# Altium PCB esp32s3.PcbDoc (part 2 of 3)
Units mm, origin at the board's own origin, x right, y up, seen from the top; angles counter-clockwise.
Board outline 131.57 x 101.6 mm, 2 copper layers (Top Layer, Bottom Layer); 173 components, 144 nets, 578 pads, 813 vias.
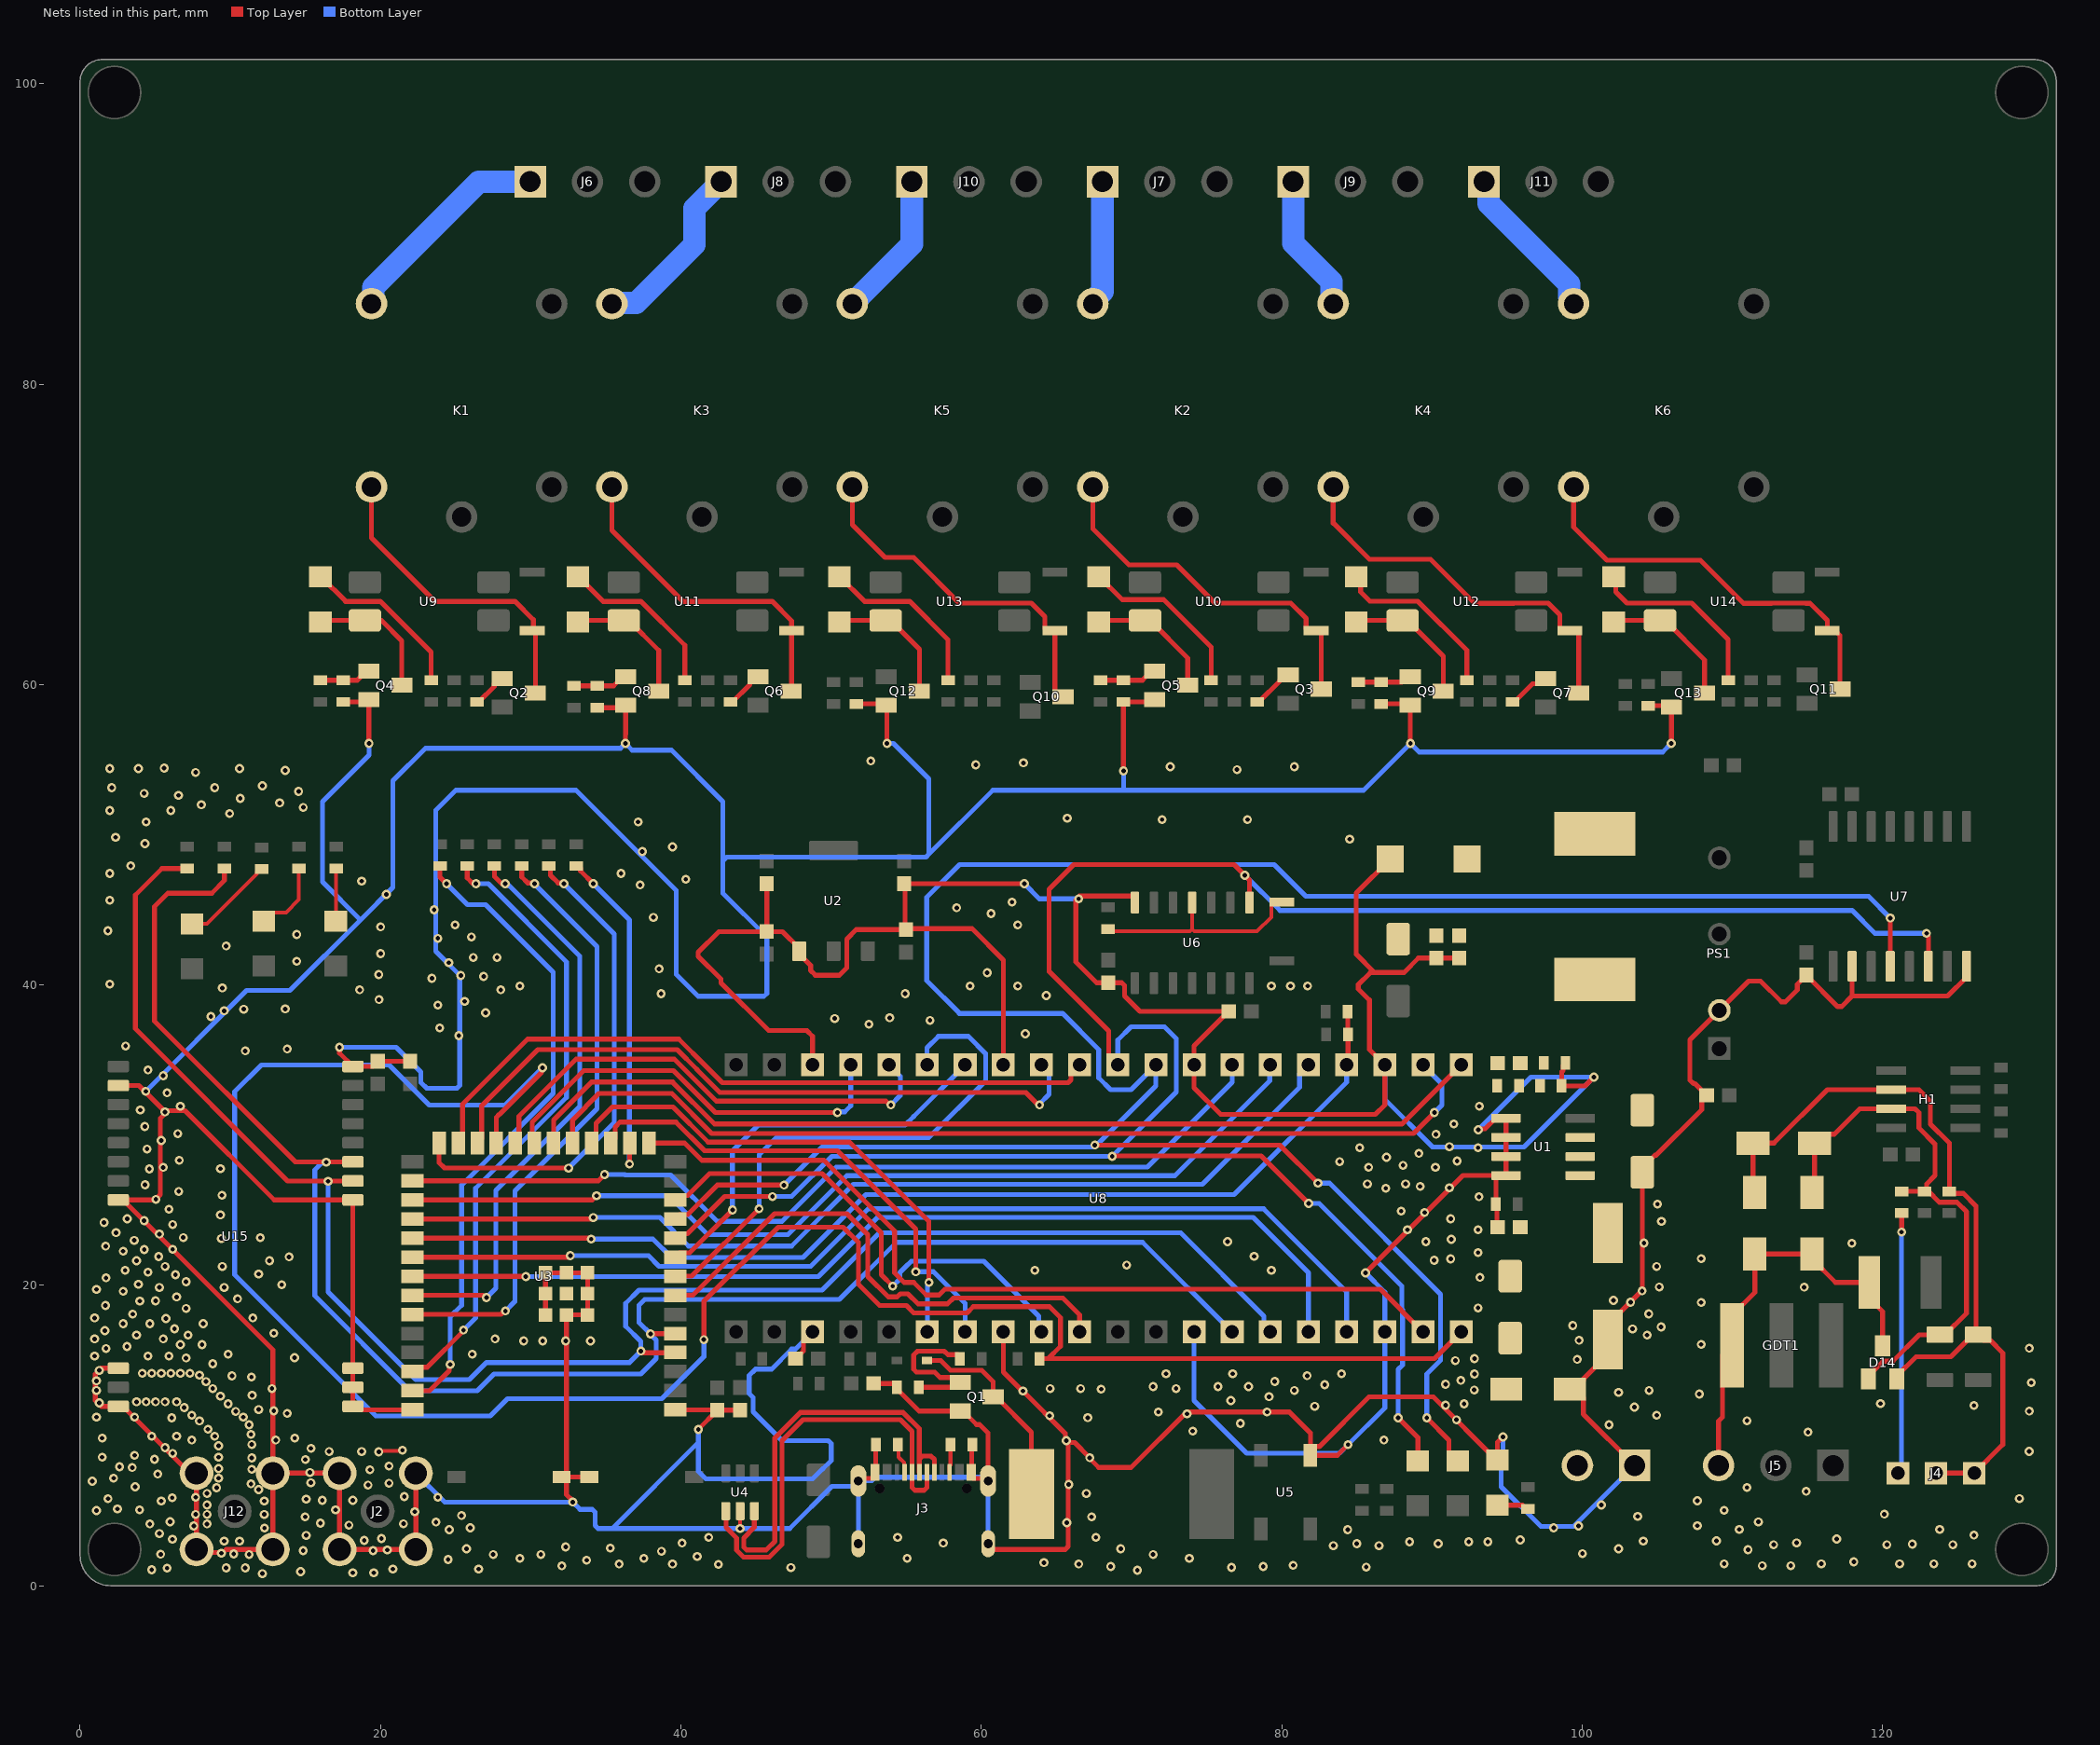
[diagram p2: the nets of this part, all layers, seen from the top]

## Via types
v1: diameter 0.6, hole 0.3, Top Layer to Bottom Layer, tented both sides, 813 vias

## Nets (pads, with @x,y where several pads share a name; then routed paths per layer and width w, separated by ;. In a path a pad name is that pad's centre, name@x,y a point inside that pad or via, vN(x,y) a via of type N, cw(c..) or ccw(c..) an arc to the next point about the centre after c; other vN are vias at no path point) (continued)
D_N: J3.A7 J3.B7 U4.1 | length 28.4
  Top Layer w0.324: U4.1@42.992,4.968 43.004,4.956 43.004,3.878 43.703,3.178 43.703,2.367 44.173,1.897 45.88,1.897 46.736,2.753 46.736,9.652 48.133,11.049 54.61,11.049 55.384,10.275 J3.B7@55.384,7.952 ; J3.B7@55.384,7.544 55.385,6.54 55.574,6.35 56.194,6.35 56.384,6.54 J3.A7@56.384,7.544
D_P: J3.A6 J3.B6 U4.3 | length 27.7
  Top Layer w0.324: U4.3@44.892,4.968 44.88,4.956 44.88,3.878 44.181,3.178 44.181,2.565 44.37,2.375 45.682,2.375 46.258,2.951 46.258,9.85 47.935,11.527 54.808,11.527 55.873,10.462 55.873,8.446 J3.A6@55.873,7.731 ; J3.A6@55.874,7.73 55.874,7.555 J3.A6@55.884,7.544 ; 55.884,8.446 56.074,8.636 56.642,8.636 56.872,8.406 56.872,7.556 J3.B6@56.884,7.544
Earth: C23.2 D11.2 D13.1 D14.3 GDT1.3 J5.3 | length 28.3
  Top Layer w0.324: J5.3@109.093,8.001 109.093,10.966 109.346,11.219 109.346,15.364 GDT1.3@109.984,16.002 109.984,18.002 111.506,19.524 D13.1@111.506,22.08 D11.2@115.316,22.08 115.316,21.755 116.878,20.193 C23.2@119.126,20.193 119.126,19.138 120.015,18.249 D14.3@120.015,15.959
  other v1: 111.999,1.33 113.904,1.33 109.459,1.457 115.936,1.457 121.143,1.457 123.429,1.457 125.969,1.457 118.095,1.584 111.053,2.392 112.761,2.727 120.297,2.727 124.689,2.727 121.991,2.769 114.285,2.854 108.951,2.981 116.952,3.108 126.096,3.362 110.475,3.743 123.81,3.743 107.681,3.997 111.745,4.251 120.127,4.759 109.459,5.013 107.681,5.648 129.123,5.801 114.92,6.283 110.983,6.537 129.771,8.938 115.047,10.22 110.983,10.982 129.779,11.617 126.096,11.998 119.873,12.125 107.808,12.76 129.906,13.522 129.779,15.808 107.935,16.062 107.935,18.856 114.793,19.872 107.935,21.777 117.968,22.793
GND: BOOT.1 C4.2 C5.1 C6.2 C7.1 C8.1 C9.1 C10.1 C11.1 C12.1 C13.1 C14.2 C15.2 C16.1 C17.1 C18.2 C19.2 C21.1 C24.2 C25.2 D3.1 D4.A J1.1 J2.G1 J2.G2 J2.G3 J2.G4 J3.A1_B12 J3.B1_A12 J3.SH1 J3.SH2 J3.SH3 J3.SH4 J12.G1 J12.G2 J12.G3 J12.G4 PS1.2 PWR.1 Q1.E Q4.E Q5.E Q8.E Q9.E Q12.E Q13.E R1.2 R2.2 R4.1 R9.1 R10.1 R20.1 R40.2 R41.2 R50.2 R51.2 R60.2 R61.2 RESET.1 U1.5 U1.6 U1.7 U1.8 U2.1 U3.1 U3.40 U3.41_1 U3.41_2 U3.41_3 U3.41_4 U3.41_5 U3.41_6 U3.41_7 U3.41_8 U3.41_9 U4.2 U5.3 U6.7 U7.2 U7.8 U8.3 U8.8 U8.13 U8.18 U8.23 U8.28 U8.33 U8.38 U15.2 U15.8 U15.11 U15.13 U15.14 U15.15 U15.16 U15.19 U15.26 | length 858.2
  Top Layer w0.254: v1(19.881,8.912) 19.934,8.965 21.411,8.965 v1(21.463,9.017) ; v1(43.942,3.81) U4.2@43.942,4.968
  Top Layer w0.324: U15.11@2.54,14.478 1.397,14.478 1.016,14.097 1.016,12.319 1.397,11.938 U15.13@2.54,11.938 2.86,11.938 7.305,7.493 J12.G1@7.747,7.493 7.747,5.886 7.747,4.743 7.747,3.981 J12.G3@7.747,2.413 7.948,2.212 9.345,2.212 v1(9.398,2.159) 9.473,2.159 9.727,2.413 J12.G4@12.827,2.413 J12.G2@12.827,7.493 ; U15.8@2.54,25.678 U15.8@2.86,25.678 ; U15.2@2.54,33.298 3.913,33.298 v1@5.581,31.63 ; v1(17.268,35.849) 17.268,35.46 U15.26@18.16,34.568 19.482,34.568 19.812,34.898 C25.2@19.812,34.913 C24.2@21.971,34.913 ; R40.2@17.526,58.838 19.064,58.838 Q4.E@19.22,58.994 v1@19.22,56.078 ; U3.40@22.135,11.711 18.707,11.711 18.48,11.938 U15.14@18.16,11.938 U15.15@18.16,13.208 U15.16@18.16,14.478 U15.19@18.16,25.678 12.93,25.678 6.978,31.63 v1@5.581,31.63 ; J2.G2@22.352,7.493 J2.G4@22.352,2.413 J2.G3@17.272,2.413 J2.G1@17.272,7.493 J12.G2@12.827,7.493 ; U3.41_3@30.985,18.031 U3.41_6@30.985,19.431 U3.41_9@30.985,20.831 U3.41_8@32.385,20.831 U3.41_7@33.785,20.831 U3.41_4@33.785,19.431 U3.41_1@33.785,18.031 U3.41_2@32.385,18.031 32.385,16.3 BOOT.1@32.385,7.239 ; BOOT.1@32.06,7.239 BOOT.1@32.385,7.239 ; v1(32.801,5.567) 32.801,5.642 32.385,6.058 BOOT.1@32.385,7.239 ; RESET.1@33.33,7.239 BOOT.1@32.385,7.239 ; R50.2@34.417,58.457 36.166,58.457 Q8.E@36.322,58.613 36.322,56.705 36.304,56.686 v1(36.304,56.078) ; U3.1@39.635,11.711 39.648,11.698 42.404,11.698 C15.2@42.418,11.684 ; v1(41.166,10.395) 41.166,10.417 42.418,11.669 C15.2@42.418,11.684 ; C14.2@43.942,11.696 43.936,11.69 42.424,11.69 C15.2@42.418,11.684 ; C11.1@45.72,46.736 C12.1@45.72,43.549 ; C16.1@47.637,15.113 47.652,15.113 48.168,15.629 48.168,16.291 U8.3@48.768,16.891 ; U8.38@48.768,34.671 48.768,36.576 48.387,36.957 45.847,36.957 42.672,40.132 42.672,40.386 41.155,41.903 41.155,42.171 42.533,43.549 C12.1@45.72,43.549 ; R60.2@51.689,58.711 53.582,58.711 Q12.E@53.68,58.613 53.721,58.572 v1(53.721,56.078) ; J3.SH1@51.814,6.974 51.976,7.136 52.796,7.136 52.934,7.274 J3.A1_B12@52.934,7.544 52.965,7.575 52.965,9.367 R9.1@52.996,9.398 ; C17.1@52.832,13.462 54.23,13.462 54.393,13.299 R20.1@54.393,13.208 54.393,13.083 55.853,11.623 Q1.E@58.59,11.623 58.79,11.623 59.69,10.723 59.893,10.723 60.454,10.162 J3.SH2@60.454,6.974 60.292,7.136 59.472,7.136 59.334,7.274 J3.B1_A12@59.334,7.544 59.367,7.577 59.367,9.366 R10.1@59.399,9.398 ; C13.1@54.927,43.676 51.677,43.676 51.046,43.045 51.046,41.14 50.546,40.64 48.958,40.64 48.636,40.962 48.636,41.297 47.875,42.058 U2.1@47.875,42.248 47.875,42.438 46.764,43.549 C12.1@45.72,43.549 ; J3.SH4@60.454,2.794 60.454,2.679 60.72,2.413 65.596,2.413 65.786,2.603 v1@65.786,9.525 ; U8.8@61.468,16.891 61.468,14.224 62.752,12.94 62.796,12.94 65.606,10.13 65.606,9.705 v1@65.786,9.525 ; U8.33@61.468,34.671 61.468,41.656 59.384,43.74 54.927,43.74 54.927,46.672 C10.1@54.864,46.736 v1(62.865,46.736) ; v1(69.47,54.245) 69.469,54.246 R41.2@69.469,58.838 71.388,58.838 Q5.E@71.544,58.994 ; U6.7@70.231,45.484 70.231,45.803 70.118,45.916 66.552,45.916 66.294,45.657 66.294,41.529 67.679,40.144 C21.1@68.453,40.144 69.351,40.144 69.54,39.954 69.54,39.252 70.565,38.227 C18.2@76.463,38.227 ; C18.2@76.478,38.227 C18.2@76.463,38.227 ; v1(84.422,9.39) 83.705,8.673 U5.3@81.914,8.673 U5.3@81.914,8.973 ; v1(85.581,20.825) 92.061,27.305 U1.8@94.409,27.305 ; R51.2@86.614,58.711 88.464,58.711 Q9.E@88.562,58.613 88.562,56.096 v1(88.58,56.078) ; C6.2@87.239,48.387 84.963,46.111 84.963,42.042 86.175,40.831 ; C7.1@91.821,41.783 C8.1@90.297,41.783 89.107,41.783 88.155,40.831 86.175,40.831 ; v1(93.091,30.353) 93.144,30.406 93.545,30.406 94.254,31.115 U1.5@94.939,31.115 U1.6@94.939,29.845 U1.7@94.939,28.575 U1.8@94.939,27.305 U1.8@94.409,27.305 ; C5.1@94.385,23.876 94.328,23.933 94.328,25.343 R4.1@94.271,25.4 94.271,27.167 U1.8@94.409,27.305 ; v1(94.742,9.906) 94.723,9.906 94.361,9.544 PWR.1@94.361,8.358 94.311,8.358 90.096,12.573 85.814,12.573 82.502,9.261 82.202,9.261 U5.3@81.914,8.973 ; R2.2@98.896,34.798 98.733,34.635 98.733,34.3 98.642,34.21 R1.2@98.642,33.274 100.203,33.274 v1(100.787,33.858) ; D3.1@99.187,13.081 D3.1@99.497,13.081 ; J1.1@103.505,8.001 100.085,11.421 100.085,12.493 D3.1@99.497,13.081 ; R61.2@104.394,58.584 105.863,58.584 Q13.E@105.961,58.486 105.961,56.168 v1@105.942,56.148 ; C9.1@108.301,32.651 C9.1@108.286,32.651 ; C19.2@114.935,40.652 C19.2@114.935,40.637 ; U7.2@117.983,41.236 117.983,39.252 ; U7.8@125.603,41.236 125.603,40.511 124.344,39.252 117.983,39.252 ; U15.8@2.86,25.678 4.977,25.678 5.334,26.035 5.334,31.115 5.581,31.362 v1@5.581,31.63 ; U15.8@2.86,25.678 12.827,15.711 J12.G2@12.827,7.493 ; v1@65.786,9.525 66.211,9.525 67.197,8.538 67.197,8.495 67.818,7.874 69.977,7.874 73.66,11.557 80.518,11.557 81.914,10.161 U5.3@81.914,8.973 ; C18.2@76.463,38.227 74.168,35.932 U8.28@74.168,34.671 74.168,33.147 75.946,31.369 86.233,31.369 86.868,32.004 U8.23@86.868,34.671 85.852,35.687 85.852,38.989 85.097,39.744 85.097,40.012 85.915,40.831 86.175,40.831 ; D3.1@99.497,13.081 100.085,13.669 100.085,13.747 101.727,15.389 C4.2@101.727,16.389 101.727,17.389 104.013,19.675 D4.A@104.013,27.526 104.013,27.807 104.873,28.667 104.947,28.667 107.978,31.698 107.978,32.343 C9.1@108.286,32.651 ; C9.1@108.286,32.651 107.52,33.417 107.426,33.417 107.188,33.655 107.188,36.348 PS1.2@109.141,38.301 111.099,40.259 111.887,40.259 113.277,38.869 113.545,38.869 114.335,39.659 114.335,40.037 C19.2@114.935,40.637 ; C19.2@114.935,40.637 117.017,38.555 117.285,38.555 117.983,39.252
  Bottom Layer w0.324: v1(4.367,32.917) 11.074,39.624 13.97,39.624 18.669,44.323 ; v1(17.268,35.849) 21.047,35.849 22.693,34.203 22.693,33.498 23.079,33.112 25.083,33.112 25.273,33.302 25.273,40.64 23.684,42.229 23.684,51.624 25.019,52.959 33.02,52.959 39.688,46.291 39.688,40.703 41.148,39.243 45.53,39.243 45.72,39.433 45.72,43.18 42.799,46.101 42.799,48.26 ; v1(19.232,56.078) 19.232,55.3 16.129,52.197 16.129,46.863 18.669,44.323 ; J2.G2@22.352,7.493 24.278,5.567 v1(32.801,5.567) 33.288,5.08 34.1,5.08 34.29,4.89 34.29,4 34.48,3.81 35.433,3.81 ; v1(41.166,10.395) 41.166,9.543 ; U8.3@48.768,16.891 47.625,15.748 47.371,15.748 46.036,14.413 44.956,14.413 44.542,13.999 44.542,12.782 44.801,12.522 44.801,11.587 46.736,9.652 49.814,9.652 50.003,9.462 50.003,8.329 49.448,7.773 49.429,7.773 48.768,7.112 41.656,7.112 41.166,7.602 41.166,9.543 ; J3.SH3@51.814,2.794 J3.SH1@51.814,6.946 ; v1(53.721,56.078) 54.158,56.078 56.515,53.721 56.515,48.704 ; J3.SH4@60.454,2.794 J3.SH2@60.454,6.974 60.213,7.215 52.937,7.215 52.707,6.985 51.825,6.985 J3.SH1@51.814,6.974 J3.SH1@51.814,6.946 ; v1(62.865,46.736) 63.868,45.733 v1(66.483,45.733) ; v1(69.47,54.245) 69.47,52.96 69.469,52.959 ; U8.13@74.168,16.891 74.168,12.319 77.67,8.817 83.849,8.817 v1(84.422,9.39) 86.868,11.836 U8.18@86.868,16.891 86.868,19.538 v1(85.581,20.825) ; U8.23@86.868,34.671 86.868,32.385 90.043,29.21 96.139,29.21 v1(100.787,33.858) 96.596,33.858 v1(93.091,30.353) ; v1(94.742,9.906) 94.742,7.874 94.615,7.747 94.615,6.585 97.263,3.937 99.441,3.937 J1.1@103.505,8.001 ; v1(105.942,56.078) 105.363,55.499 89.159,55.499 v1(88.58,56.078) 85.461,52.959 69.469,52.959 ; 18.669,44.323 20.828,46.482 20.828,53.594 22.987,55.753 35.976,55.753 36.301,56.078 v1(36.304,56.078) 36.756,55.626 39.37,55.626 42.799,52.197 42.799,48.26 ; 35.433,3.81 v1(43.942,3.81) 47.25,3.81 50.051,6.611 51.478,6.611 J3.SH1@51.814,6.946 ; 35.433,3.81 41.166,9.543 ; 42.799,48.26 43.053,48.514 56.325,48.514 56.515,48.704 ; 56.515,48.704 60.77,52.959 69.469,52.959
  other v1: 12.134,0.806 18.153,0.856 19.55,0.856 14.674,0.933 70.394,1.024 4.768,1.06 20.82,1.11 26.535,1.11 5.793,1.166 9.721,1.187 10.991,1.187 47.319,1.208 76.662,1.216 85.626,1.237 68.616,1.278 78.776,1.278 32.073,1.314 80.766,1.359 42.499,1.415 35.883,1.441 39.439,1.441 66.49,1.441 64.171,1.532 33.724,1.695 24.503,1.745 29.279,1.822 37.534,1.822 55.06,1.822 73.856,1.822 41.09,1.949 5.36,2.092 11.245,2.076 27.501,2.076 30.676,2.076 71.443,2.076 10.223,2.116 100.029,2.138 38.702,2.291 14.845,2.337 19.5,2.33 20.449,2.38 25.723,2.457 69.284,2.457 102.431,2.457 35.298,2.507 32.327,2.584 83.439,2.667 86.487,2.667 84.999,2.802 90.424,2.794 40.074,2.838 57.473,2.838 88.519,2.921 92.456,2.921 93.726,2.921 9.594,2.965 10.61,2.965 104.082,2.965 18.915,3.015 95.885,3.048 6.147,3.096 20.058,3.142 41.852,3.219 54.425,3.219 67.633,3.219 15.055,3.346 5.276,3.473 24.58,3.727 84.397,3.727 12.27,3.836 25.977,3.854 98.113,3.854 7.562,3.981 99.764,3.981 17.899,4.031 4.641,4.108 8.451,4.108 21.529,4.124 15.994,4.158 65.695,4.199 23.691,4.235 5.99,4.258 67.346,4.58 14.978,4.585 103.701,4.616 25.392,4.666 7.689,4.743 8.451,4.743 12.261,4.743 22.276,4.926 1.085,4.997 3.962,5.045 17.01,5.047 2.485,5.104 8.451,5.378 101.288,5.378 5.403,5.632 12.261,5.632 16.121,5.682 18.153,5.682 15.055,5.759 1.855,5.794 6.128,5.853 7.689,5.886 23.818,5.886 21.582,5.936 8.451,6.14 66.998,6.14 11.88,6.394 9.086,6.521 3.666,6.581 19.169,6.698 65.822,6.739 11.372,6.775 20.566,6.825 15.359,6.852 0.811,6.955 2.228,7.156 9.213,7.156 5.163,7.428 15.302,7.538 19.296,7.714 11.43,7.747 9.213,7.791 3.469,7.861 2.623,7.92 20.566,7.968 4.946,8.412 14.997,8.395 11.43,8.509 67.219,8.517 1.466,8.553 9.213,8.553 3.625,8.68 6.165,8.807 16.579,8.934 18.738,8.934 15.367,9.144 5.657,9.188 9.213,9.315 11.43,9.398 65.659,9.652 7.435,9.696 13.023,9.696 86.81,9.696 1.466,9.823 14.293,9.823 4.768,9.95 6.419,9.95 8.959,9.95 11.372,10.077 74.077,10.295 8.509,10.414 11.245,10.712 101.796,10.712 77.252,10.803 7.943,10.966 91.64,11.043 6.096,11.176 67.092,11.184 1.085,11.22 3.625,11.22 10.864,11.22 64.552,11.311 7.435,11.347 104.971,11.347 73.696,11.438 13.785,11.474 71.791,11.565 79.03,11.565 10.356,11.601 12.896,11.646 11.88,11.728 6.927,11.855 103.487,11.888 82.205,11.946 90.914,12.015 9.848,12.109 92.144,12.109 1.276,12.173 3.752,12.236 4.387,12.236 5.022,12.236 5.657,12.236 6.419,12.236 76.617,12.327 79.157,12.581 9.34,12.617 11.453,12.672 102.431,12.871 62.774,12.962 1.085,12.998 80.841,12.998 104.463,12.998 92.819,13.031 67.981,13.089 8.832,13.125 12.769,13.125 64.585,13.125 66.617,13.125 72.967,13.125 71.443,13.252 75.761,13.252 77.793,13.252 82.873,13.379 90.914,13.412 8.382,13.589 79.538,13.597 1.085,13.633 91.93,13.666 11.408,13.896 10.109,13.971 81.697,13.978 7.943,14.014 72.299,14.105 76.744,14.105 83.983,14.105 92.837,14.097 4.133,14.141 4.768,14.141 5.403,14.141 6.038,14.141 6.673,14.141 7.308,14.141 1.276,14.332 8.832,14.776 91.567,14.986 99.677,15.063 92.837,15.113 7.054,15.157 14.277,15.174 0.958,15.284 4.514,15.284 5.911,15.284 9.848,15.411 26.104,15.411 1.72,15.792 3.117,15.919 6.673,16.046 8.114,16.044 29.533,16.3 30.803,16.3 32.327,16.3 33.978,16.3 99.804,16.333 0.958,16.427 5.53,16.427 27.628,16.427 3.752,16.681 7.181,16.681 104.336,16.681 12.896,16.808 1.641,16.983 6.288,17.097 103.36,17.095 105.265,17.222 99.383,17.316 2.863,17.443 4.641,17.443 8.197,17.443 5.715,17.78 0.958,17.824 11.499,17.824 3.498,18.078 104.443,18.096 7.054,18.459 93.073,18.492 1.682,18.653 103.233,18.873 3.974,18.949 5.022,18.967 102.09,19 10.483,19.094 6.419,19.221 2.863,19.602 103.995,19.625 1.085,19.729 5.276,19.856 9.594,19.856 105.138,19.889 13.417,20.036 3.875,20.066 7.054,20.237 1.72,20.491 93.2,20.524 6.35,20.701 11.88,20.745 4.514,20.872 2.99,20.999 63.569,20.999 79.317,20.999 5.657,21.253 9.467,21.253 104.971,21.253 69.684,21.344 3.752,21.634 12.605,21.628 90.152,21.667 91.255,21.761 13.912,21.888 5.226,21.912 78.166,21.933 93.073,22.175 2.863,22.269 4.269,22.381 6.165,22.396 1.702,22.605 104.122,22.81 76.396,22.904 89.604,22.904 3.596,22.992 91.295,23.064 9.398,23.114 6.864,23.176 11.996,23.174 5.276,23.412 2.395,23.501 88.374,23.699 93.073,23.699 6.165,24.047 1.593,24.174 105.283,24.257 4.26,24.301 3.13,24.427 91.255,24.428 9.34,24.682 89.517,24.842 87.953,24.936 5.911,25.063 105.029,25.4 5.046,25.722 93.14,25.89 9.442,25.996 6.568,26.248 86.937,26.46 91.168,26.493 89.223,26.587 4.321,26.691 85.707,26.747 88.247,26.747 4.611,27.746 9.342,27.763 5.53,27.848 85.794,27.857 90.239,27.857 88.08,27.984 83.858,28.234 91.676,28.271 6.602,28.325 86.977,28.525 89.136,28.779 4.457,29.074 85.199,29.16 93.073,29.16 91.166,29.227 5.403,29.635 90.279,30.049 6.5,30.095 4.304,30.571 91.464,30.745 5.65,31.54 4.006,31.667 6.673,31.921 93.16,31.921 5.784,32.81 5.53,33.953 4.514,34.334 10.991,35.604 13.785,35.731 3.028,35.933 25.215,36.62 62.934,36.747 23.945,37.128 52.52,37.382 56.584,37.636 50.234,37.763 53.906,37.807 8.705,37.89 26.993,38.144 9.594,38.271 10.891,38.383 13.658,38.398 23.818,38.652 25.596,38.906 19.902,39.019 64.331,39.287 38.677,39.414 54.933,39.414 18.611,39.668 28.009,39.668 9.467,39.795 29.279,39.922 59.251,39.922 62.426,39.922 79.317,39.922 80.587,39.922 81.73,39.922 1.974,40.049 23.42,40.442 26.866,40.557 25.343,40.619 19.881,40.684 60.394,40.811 38.55,41.065 24.548,41.479 14.42,41.573 26.173,41.826 27.755,41.827 20.008,42.081 9.721,42.589 23.818,43.097 26.055,43.194 14.42,43.351 1.847,43.605 20.008,43.859 24.961,43.986 62.426,43.986 38.169,44.494 60.648,44.748 23.564,45.002 58.362,45.129 62.045,45.51 1.974,45.637 20.389,46.018 37.28,46.653 18.738,46.907 40.328,47.034 1.974,47.415 36.01,47.415 3.371,47.923 37.43,48.881 39.439,49.193 4.318,49.403 84.524,49.701 2.355,49.828 4.387,50.844 37.153,50.844 72.034,51.003 77.727,51.006 65.728,51.098 9.955,51.41 1.974,51.606 6.038,51.606 14.859,51.816 8.07,51.987 13.277,52.114 10.655,52.418 6.546,52.622 4.26,52.749 14.547,52.876 2.101,53.13 8.959,53.13 12.134,53.257 7.689,54.146 13.658,54.273 77.027,54.334 1.974,54.4 3.879,54.4 10.61,54.4 5.592,54.437 72.586,54.527 80.841,54.527 59.632,54.654 62.807,54.781 52.647,54.908
GPIO1: R11.1 U3.39 | length 43.3
  Top Layer w0.324: U3.39@22.135,12.981 23.255,12.981 24.585,14.311 24.585,14.679 v1(24.638,14.732) ; R11.1@23.965,47.916 23.965,47.17 v1(24.399,46.736)
  Bottom Layer w0.324: v1(24.399,46.736) 25.796,45.339 26.988,45.339 31.496,40.831 31.496,32.766 25.4,26.67 25.4,18.669 24.638,17.907 v1(24.638,14.732)
GPIO2: R13.1 U3.38 | length 41.5
  Top Layer w0.324: U3.38@22.135,14.251 22.423,14.539 23.101,14.539 23.217,14.655 25.527,16.965 v1(25.527,17.018) ; R13.1@25.776,47.916 25.776,47.122 v1@26.162,46.736
  Bottom Layer w0.324: v1(25.527,17.018) 26.335,17.826 26.335,26.462 32.385,32.512 32.385,41.529 27.178,46.736 v1(26.352,46.736)
GPIO3: U3.15 U8.19 | length 58.7
  Top Layer w0.324: U3.15@37.87,29.471 40.24,29.471 41.39,28.321 49.53,28.321 54.229,23.622 54.229,20.828 54.864,20.193 55.499,20.193 56.342,19.35 57.196,19.35 57.578,19.732 86.567,19.732 U8.19@89.408,16.891
GPIO4: R21.1 U3.4 U8.15 U15.20 | length 117.1
  Top Layer w0.324: R21.1@7.131,47.742 5.451,47.742 3.683,45.974 3.683,37.084 13.819,26.948 16.486,26.948 v1(16.51,26.924) ; v1@16.534,26.948 16.546,26.936 18.148,26.936 U15.20@18.16,26.948 ; v1(37.338,15.621) 37.413,15.621 37.526,15.507 39.622,15.507 U3.4@39.635,15.521
  Bottom Layer w0.324: v1(16.51,26.924) 16.51,19.558 22.352,13.716 25.908,13.716 27.051,14.859 36.576,14.859 v1(37.338,15.621) 37.338,16.256 36.322,17.272 36.322,18.796 37.211,19.685 49.403,19.685 53.213,23.495 73.279,23.495 78.825,17.949 78.825,17.314 U8.15@79.248,16.891
GPIO5: R22.1 U3.5 U8.14 U15.21 | length 115.9
  Top Layer w0.324: R22.1@9.607,47.742 9.607,46.945 8.763,46.101 5.842,46.101 4.953,45.212 4.953,37.592 14.327,28.218 16.359,28.218 v1(16.383,28.194) ; v1@16.407,28.218 16.419,28.206 18.148,28.206 U15.21@18.16,28.218 ; v1(37.973,16.764) 37.987,16.778 39.622,16.778 U3.5@39.635,16.791
  Bottom Layer w0.324: v1(16.383,28.194) 16.33,28.141 16.076,28.141 15.621,27.686 15.621,19.304 21.944,12.981 26.443,12.981 27.559,14.097 37.338,14.097 38.354,15.113 38.354,16.348 37.973,16.729 v1(37.973,16.764) 37.211,17.526 37.211,18.669 37.592,19.05 50.546,19.05 54.356,22.86 70.739,22.86 U8.14@76.708,16.891
GPIO7: U3.7 U8.10 | length 35.2
  Top Layer w0.324: U3.7@39.635,19.331 40.794,19.331 46.228,24.765 51.054,24.765 52.451,23.368 52.451,20.574 53.802,19.223 54.399,19.223 54.606,19.431 55.118,19.431 55.787,18.762 57.751,18.762 58.144,19.155 65.427,19.155 66.548,18.034 U8.10@66.548,16.891
GPIO8: U3.12 U8.9 | length 33.3
  Top Layer w0.324: U3.12@39.635,25.681 39.923,25.969 40.447,25.969 41.91,27.432 49.403,27.432 53.34,23.495 53.34,20.701 v1(54.102,19.939)
  Bottom Layer w0.324: v1(54.102,19.939) 54.589,20.426 54.589,20.857 54.924,21.191 55.343,21.611 60.177,21.611 63.839,17.949 63.839,17.06 U8.9@64.008,16.891
GPIO9: U3.17 U8.7 | length 33.2
  Top Layer w0.324: U3.17@35.33,29.471 35.618,29.759 35.618,30.538 35.941,30.861 39.667,30.861 41.572,28.956 50.419,28.956 55.639,23.736 v1(55.639,20.895)
  Bottom Layer w0.324: v1(55.639,20.895) 55.651,20.907 56.81,20.907 58.928,18.789 U8.7@58.928,16.891
GPIO10: U3.18 U8.6 | length 34.6
  Top Layer w0.324: U3.18@34.06,29.471 34.348,29.759 34.348,30.792 35.433,31.877 39.468,31.877 41.812,29.534 51.238,29.534 56.513,24.259 v1(56.513,20.191)
  Bottom Layer w0.324: U8.6@56.388,16.891 56.414,16.917 56.414,20.017 56.513,20.116 v1(56.513,20.191)
GPIO11: U3.19 U8.22 | length 65.2
  Top Layer w0.324: U3.19@32.79,29.471 32.79,31.012 34.544,32.766 39.396,32.766 42.051,30.111 88.785,30.111 v1(90.17,31.496)
  Bottom Layer w0.324: U8.22@89.408,34.671 90.678,33.401 90.678,32.004 v1(90.17,31.496)
GPIO12: U3.20 U8.21 | length 65.8
  Top Layer w0.324: U3.20@31.52,29.471 31.52,31.012 34.036,33.528 39.451,33.528 42.245,30.734 88.011,30.734 U8.21@91.948,34.671
GPIO13: U3.21 U8.37 | length 28.2
  Top Layer w0.324: U3.21@30.25,29.471 30.099,29.622 30.099,30.861 33.528,34.29 39.506,34.29 42.3,31.496 v1(50.419,31.496)
  Bottom Layer w0.324: v1(50.419,31.496) 50.472,31.549 50.91,31.549 51.308,31.947 U8.37@51.308,34.671
GPIO14: U3.22 U8.36 | length 32.7
  Top Layer w0.324: U3.22@28.98,29.471 29.21,29.701 29.21,31.242 33.02,35.052 39.561,35.052 42.352,32.261 53.647,32.261 53.904,32.004 v1(53.975,32.004)
  Bottom Layer w0.324: U8.36@53.848,34.671 54.61,33.909 54.61,32.639 v1(53.975,32.004)
GPIO15: U3.8 U8.35 | length 35.8
  Top Layer w0.324: U3.8@39.635,20.601 40.713,20.601 v1(45.204,25.092)
  Bottom Layer w0.324: v1(45.204,25.092) 45.204,28.694 46.355,29.845 56.515,29.845 60.29,33.62 60.29,35.421 59.135,36.576 57.15,36.576 56.388,35.814 U8.35@56.388,34.671
GPIO16: U3.9 U8.34 | length 26.9
  Top Layer w0.324: U3.9@39.635,21.871 39.923,22.159 40.574,22.159 v1(43.434,25.019)
  Bottom Layer w0.324: v1(43.434,25.019) 43.434,28.956 45.149,30.671 54.928,30.671 55.499,31.242 U8.34@58.928,34.671
GPIO17: TXD.1 U3.10 U6.1 U7.6 U8.30 | length 161.2
  Top Layer w0.324: U3.10@39.635,23.141 39.923,23.429 40.441,23.429 42.926,25.914 46.095,25.914 v1(46.101,25.908) ; v1(68.719,28.587) 68.754,28.622 78.625,28.622 v1(81.794,25.454) ; U8.30@69.088,34.671 68.488,35.271 68.488,36.922 64.516,40.894 64.516,46.355 66.167,48.006 76.835,48.006 77.851,46.99 U6.1@77.851,45.484 ; v1(87.757,11.176) 89.068,9.865 TXD.1@89.068,8.314 ; v1(122.936,43.434) 122.936,43.359 123.063,43.232 U7.6@123.063,41.236
  Bottom Layer w0.324: v1(46.101,25.908) 47.371,25.908 50.05,28.587 v1(68.719,28.587) 72.99,32.858 72.99,36.414 72.193,37.211 69.977,37.211 69.088,36.322 U8.30@69.088,34.671 ; v1(77.544,47.299) 79.885,44.958 117.983,44.958 119.507,43.434 v1(122.936,43.434) ; v1(81.794,25.454) 82.496,25.454 88.011,19.939 88.011,18.415 88.046,18.38 88.046,14.682 87.757,14.394 v1(87.757,11.176)
GPIO18: RXD.1 U3.11 U7.4 U8.29 | length 171.9
  Top Layer w0.324: U3.11@39.635,24.411 39.923,24.699 40.447,24.699 42.418,26.67 v1(46.863,26.67) ; v1(67.564,29.337) 79.883,29.337 v1(82.423,26.797) ; v1(89.662,11.176) 91.147,9.691 91.147,8.852 91.685,8.314 RXD.1@91.735,8.314 ; U7.4@120.523,41.236 v1(120.523,44.45)
  Bottom Layer w0.324: v1(46.863,26.67) 49.403,29.21 67.564,29.21 71.628,33.274 U8.29@71.628,34.671 69.977,33.02 68.615,33.02 67.818,33.817 67.818,35.687 65.405,38.1 58.547,38.1 56.369,40.278 56.369,45.828 58.556,48.015 79.493,48.015 81.617,45.891 119.082,45.891 v1(120.523,44.45) ; v1(82.423,26.797) 83.185,26.797 90.586,19.396 90.586,15.006 89.662,14.082 v1(89.662,11.176)
GPIO21: R16.1 U3.23 U8.20 | length 144.5
  Top Layer w0.324: U3.23@27.71,29.471 27.71,31.179 27.9,31.369 27.921,31.369 30.727,34.175 30.727,34.429 v1(30.78,34.482) ; v1(41.529,16.383) 41.529,18.923 46.482,23.876 50.8,23.876 51.816,22.86 51.816,20.066 53.237,18.645 55.015,18.645 55.499,18.161 59.055,18.161 59.471,18.577 64.546,18.577 65.278,17.844 65.278,15.935 64.456,15.113 ; R16.1@63.881,15.113 64.456,15.113 ; U8.20@91.948,16.891 90.17,15.113 64.456,15.113
  Bottom Layer w0.324: v1(30.78,34.482) 28.302,32.004 23.25,32.004 20.583,34.671 12.065,34.671 10.287,32.893 10.287,20.701 19.685,11.303 27.305,11.303 28.448,12.446 38.735,12.446 41.529,15.24 v1(41.529,16.383)
GPIO35: U3.28 U8.27 | length 61
  Top Layer w0.324: U3.28@22.135,26.951 34.497,26.951 v1(34.918,27.372)
  Bottom Layer w0.324: v1(34.918,27.372) 36.259,27.372 36.279,27.351 39.324,27.351 42.418,24.257 46.736,24.257 50.351,27.872 71.052,27.872 76.708,33.528 U8.27@76.708,34.671
GPIO36: U3.29 U8.26 | length 63.6
  Top Layer w0.324: U3.29@22.135,25.681 34.1,25.681 v1(34.379,25.96)
  Bottom Layer w0.324: v1(34.379,25.96) 39.191,25.96 41.783,23.368 47.117,23.368 51.043,27.294 72.887,27.294 79.206,33.613 79.206,34.629 U8.26@79.248,34.671
GPIO37: U3.30 U8.25 | length 66
  Top Layer w0.324: U3.30@22.135,24.411 34.063,24.411 v1(34.163,24.511)
  Bottom Layer w0.324: v1(34.163,24.511) 38.608,24.511 40.513,22.606 47.371,22.606 51.481,26.716 74.722,26.716 81.188,33.182 81.188,34.071 U8.25@81.788,34.671
GPIO38: R8.1 R15.1 U3.31 U8.24 | length 72.3
  Top Layer w0.324: U3.31@22.135,23.141 33.963,23.141 v1(34.027,23.076) ; U8.24@84.328,34.671 84.418,34.761 R15.1@84.418,36.703 84.4,36.722 84.4,38.208 R8.1@84.381,38.227
  Bottom Layer w0.324: v1(34.027,23.076) 38.138,23.076 39.37,21.844 48.133,21.844 52.324,26.035 76.835,26.035 84.328,33.528 U8.24@84.328,34.671
GPIO39: U3.32 U8.17 | length 69.1
  Top Layer w0.324: U3.32@22.135,21.871 32.464,21.871 32.564,21.971 v1(32.639,21.971)
  Bottom Layer w0.324: v1(32.639,21.971) 37.846,21.971 38.551,21.266 48.643,21.266 52.466,25.089 78.797,25.089 84.328,19.558 U8.17@84.328,16.891
GPIO40: U3.33 U8.16 | length 66.8
  Top Layer w0.324: U3.33@22.135,20.601 22.148,20.588 29.658,20.588 v1(29.672,20.574)
  Bottom Layer w0.324: v1(29.672,20.574) 49.149,20.574 53.086,24.511 78.105,24.511 81.788,20.828 U8.16@81.788,16.891
GPIO41: R18.1 U3.34 | length 38.6
  Top Layer w0.324: U3.34@22.135,19.331 26.822,19.331 26.976,19.177 v1(27.051,19.177) ; R18.1@27.587,47.916 27.587,47.216 v1@28.067,46.736
  Bottom Layer w0.324: v1(27.051,19.177) 27.686,19.812 27.686,26.321 33.274,31.909 33.274,41.91 28.586,46.598 28.518,46.598 28.38,46.736 v1(28.305,46.736)
GPIO42: R12.1 U3.35 | length 40.7
  Top Layer w0.324: U3.35@22.135,18.061 28.019,18.061 28.246,18.288 v1(28.321,18.288) ; R12.1@29.398,47.916 29.398,47.183 29.792,46.789 30.173,46.789 v1@30.226,46.736
  Bottom Layer w0.324: v1(28.321,18.288) 28.956,18.923 28.956,26.289 34.417,31.75 34.417,42.545 30.258,46.704 v1(30.258,46.736)
GPIO45: R14.1 U3.26 | length 33.4
  Top Layer w0.324: U3.26@23.9,29.471 23.9,28.17 24.257,27.813 32.511,27.813 v1(32.523,27.801) ; R14.1@31.209,47.916 31.318,47.807 31.318,47.295 31.824,46.789 32.157,46.789 v1(32.21,46.736)
  Bottom Layer w0.324: v1(32.21,46.736) 35.56,43.386 35.56,30.837 v1(32.523,27.801)
GPIO46: R19.1 U3.16 | length 22.8
  Top Layer w0.324: R19.1@33.02,47.916 33.145,47.916 33.308,47.753 33.308,47.591 v1(34.163,46.736) ; v1(36.576,28.067) 36.588,28.079 36.588,29.459 U3.16@36.6,29.471
  Bottom Layer w0.324: v1(34.163,46.736) 36.576,44.323 v1(36.576,28.067)
GPIO47: U3.24 U8.32 | length 46
  Top Layer w0.324: U3.24@26.44,29.471 26.728,29.759 26.728,31.935 30.48,35.687 39.751,35.687 41.069,34.369 41.069,34.361 42.591,32.839 62.971,32.839 63.806,32.004 v1(63.881,32.004)
  Bottom Layer w0.324: v1(63.881,32.004) 63.881,32.079 64.516,32.714 64.516,34.163 U8.32@64.008,34.671
GPIO48: U3.25 U8.31 | length 47.5
  Top Layer w0.324: U3.25@25.17,29.471 25.458,29.759 25.458,32.062 29.788,36.392 39.863,36.392 41.647,34.608 41.647,34.6 42.754,33.493 52.944,33.493 65.783,33.493 65.973,33.683 65.973,34.096 U8.31@66.548,34.671
NC1: J6.1 K1.5 | length 14.5
  Bottom Layer w1.5: K1.5@19.4,85.352 19.515,85.467 19.515,86.444 26.543,93.472 J6.1@29.972,93.472
NC2: J8.1 K3.5 | length 12
  Bottom Layer w1.5: K3.5@35.408,85.352 35.463,85.407 37.02,85.407 40.894,89.281 40.894,91.694 J8.1@42.672,93.472
NC3: J10.1 K5.5 | length 9.8
  Bottom Layer w1.5: K5.5@51.416,85.352 55.372,89.308 J10.1@55.372,93.472
NC4: J7.1 K2.5 | length 8.4
  Bottom Layer w1.5: K2.5@67.425,85.352 67.425,85.514 68.072,86.162 J7.1@68.072,93.472
NC5: J9.1 K4.5 | length 9.2
  Bottom Layer w1.5: J9.1@80.772,93.472 80.772,93.182 80.782,93.172 80.782,89.369 83.318,86.833 83.318,85.467 K4.5@83.433,85.352
NC6: J11.1 K6.5 | length 10.6
  Bottom Layer w1.5: J11.1@93.472,93.472 93.772,93.172 93.772,92.029 99.141,86.66 99.141,85.814 99.441,85.514 K6.5@99.441,85.352
NetC1_1: C1.1 C6.1 C7.2 C8.2 D2.A L.1 R3.1
NetC1_2: C1.2 R1.1 R2.1 R3.2 U1.3
NetC4_1: C4.1 C5.2 D1.C U1.1
NetD1_A: D1.A D3.2 J1.2
NetD4_C: D4.C L.2 U1.2
NetD7_A: D7.A LS1.2 Q1.C | length 13.6
  Top Layer w0.324: D7.A@56.388,14.986 57.302,14.986 57.949,14.339 60.031,14.339 60.79,13.58 Q1.C@60.79,12.573 60.99,12.573 63.342,10.221 LS1.2@63.342,6.096
NetD8_C: D8.C R25.2 U6.4 | length 15
  Top Layer w0.254: R25.2@68.363,43.778 R25.2@68.509,43.632 ; R25.2@68.453,43.725 68.617,43.561 73.892,43.561 74.041,43.71 ; U6.4@74.041,45.484 74.041,43.71 ; D8.C@80.01,45.511 79.485,45.511 79.312,45.338 79.312,44.514 78.359,43.561 74.19,43.561 74.041,43.71
NetD11_1: D11.1 D12.2 D14.1 F1.1 H1.7 R27.2 R30.1 | length 37.3
  Top Layer w0.324: D11.1@115.316,26.18 115.479,26.343 D12.2@115.479,29.464 116.073,30.058 116.799,30.058 118.491,31.75 H1.7@120.599,31.75 122.174,31.75 122.428,31.496 122.428,30.48 123.507,29.4 123.507,27.31 122.936,26.739 R30.1@122.936,26.252 ; D14.1@119.065,13.759 119.065,13.959 120.049,14.943 120.693,14.943 122.454,16.705 F1.1@123.825,16.705 124.165,16.705 125.603,18.143 125.603,24.894 124.97,25.527 123.786,25.527 123.061,26.252 R30.1@122.936,26.252 ; R27.2@121.412,26.252 R30.1@122.936,26.252
NetD12_1: D12.1 D13.2 D14.2 F2.1 H1.6 J4.02 J4.03 R31.2 | length 54.4
  Top Layer w0.324: D13.2@111.506,26.18 111.379,26.307 D12.1@111.379,29.464 112.776,29.464 116.332,33.02 H1.6@120.599,33.02 122.428,33.02 123.19,32.258 123.19,30.734 124.46,29.464 R31.2@124.46,26.252 124.597,26.115 125.396,26.115 126.238,25.273 126.238,16.832 126.748,16.322 127.188,16.322 128.016,15.494 128.016,9.398 J4.03@126.111,7.493 J4.02@123.571,7.493 ; D14.2@120.965,13.759 120.965,13.959 122.246,15.24 124.56,15.24 126.025,16.705 F2.1@126.238,16.705
NetD15_A: D15.A K1.3 Q2.C | length 21.4
  Top Layer w0.324: K1.3@19.4,73.152 19.4,69.754 23.622,65.532 28.956,65.532 30.172,64.316 30.172,63.582 30.31,63.444 Q2.C@30.31,59.436
NetD16_A: D16.A K2.3 Q3.C | length 25
  Top Layer w0.324: K2.3@67.425,73.152 67.425,70.37 69.837,67.958 73.012,67.958 75.552,65.418 80.603,65.418 81.633,64.388 81.633,63.72 81.771,63.582 D16.A@82.296,63.582 82.496,63.582 82.634,63.444 Q3.C@82.634,59.69
NetD17_1: D17.1 Q4.C U9.2 | length 9
  Top Layer w0.324: D17.1@16.002,64.159 16.105,64.262 U9.2@18.961,64.262 20.066,64.262 21.42,62.908 Q4.C@21.42,59.944
NetD17_2: D17.2 R34.2 | length 11.3
  Top Layer w0.324: D17.2@16.002,67.159 16.052,67.159 17.679,65.532 19.991,65.532 23.368,62.155 R34.2@23.368,60.288
NetD18_1: D18.1 Q5.C U10.2 | length 8.8
  Top Layer w0.324: D18.1@67.818,64.159 67.921,64.262 U10.2@70.904,64.262 71.239,64.262 73.744,61.757 Q5.C@73.744,59.944
NetD18_2: D18.2 R35.2 | length 11.6
  Top Layer w0.324: D18.2@67.818,67.159 67.868,67.159 69.381,65.646 72.149,65.646 75.311,62.484 R35.2@75.311,60.288
NetD19_A: D19.A K3.3 Q6.C | length 22
  Top Layer w0.324: K3.3@35.408,73.152 35.408,70.256 40.132,65.532 46.08,65.532 47.371,64.241 D19.A@47.371,63.582 47.371,59.606 Q6.C@47.328,59.563
NetD20_A: D20.A K4.3 Q7.C | length 26.3
  Top Layer w0.324: K4.3@83.433,73.152 83.433,70.745 85.852,68.326 89.916,68.326 92.837,65.405 95.457,65.405 95.47,65.418 97.748,65.418 98.524,64.642 98.524,63.72 98.662,63.582 D20.A@99.187,63.582 99.641,63.582 99.779,63.444 Q7.C@99.779,59.436
NetD21_1: D21.1 Q8.C U11.2 | length 8.9
  Top Layer w0.324: D21.1@33.147,64.159 33.25,64.262 U11.2@36.195,64.262 36.53,64.262 38.522,62.27 Q8.C@38.522,59.563
NetD21_2: D21.2 R44.2 | length 11.3
  Top Layer w0.324: D21.2@33.147,67.159 33.197,67.159 34.824,65.532 37.338,65.532 40.259,62.611 R44.2@40.259,60.288
NetD22_1: D22.1 Q9.C U12.2 | length 9.1
  Top Layer w0.324: D22.1@84.963,64.159 85.066,64.262 U12.2@88.049,64.262 88.384,64.262 90.762,61.884 Q9.C@90.762,59.563
NetD22_2: D22.2 R45.2 | length 11.8
  Top Layer w0.324: D22.2@84.963,67.159 85.259,66.863 85.259,66.163 85.877,65.545 89.061,65.545 92.329,62.277 R45.2@92.329,60.288
NetD23_A: D23.A K5.3 Q10.C | length 24.1
  Top Layer w0.324: K5.3@51.416,73.152 51.416,70.631 53.594,68.453 55.499,68.453 58.534,65.418 63.331,65.418 64.234,64.515 64.234,63.72 64.372,63.582 D23.A@64.897,63.582 64.897,59.531 65.246,59.182 Q10.C@65.446,59.182
NetD24_A: D24.A K6.3 Q11.C | length 27.4
  Top Layer w0.324: K6.3@99.441,73.152 99.441,70.485 101.651,68.275 107.874,68.275 110.744,65.405 112.602,65.405 112.615,65.418 114.893,65.418 114.906,65.405 115.189,65.405 116.332,64.262 D24.A@116.332,63.582 116.857,63.582 117.178,63.261 Q11.C@117.178,59.69
NetD25_1: D25.1 Q12.C U13.2 | length 9
  Top Layer w0.324: D25.1@50.546,64.159 50.649,64.262 U13.2@53.632,64.262 53.967,64.262 55.88,62.349 Q12.C@55.88,59.563
NetD25_2: D25.2 R54.2 | length 11.7
  Top Layer w0.324: D25.2@50.546,67.159 50.596,67.159 52.223,65.532 55.236,65.532 57.785,62.983 R54.2@57.785,60.288
NetD26_1: D26.1 Q13.C U14.2 | length 9.4
  Top Layer w0.324: D26.1@102.108,64.159 102.211,64.262 U14.2@105.194,64.262 105.529,64.262 108.161,61.63 Q13.C@108.161,59.436
NetD26_2: D26.2 R55.2 | length 12.6
  Top Layer w0.324: D26.2@102.108,67.159 102.239,67.028 102.239,66.163 102.984,65.418 107.302,65.418 109.728,62.992 R55.2@109.728,60.288
NetJ3_A5: J3.A5 R9.2 | length 2
  Top Layer w0.254: R9.2@54.446,9.398 54.492,9.352 54.492,8.553 54.861,8.184 54.861,7.567 J3.A5@54.884,7.544
NetJ3_B5: J3.B5 R10.2 | length 1.9
  Top Layer w0.254: J3.B5@57.884,7.544 57.884,7.964 57.949,8.029 R10.2@57.949,9.398
NetJ4_01: J4.01 R27.1 | length 17.4
  Top Layer w0.324: v1(121.276,23.546) 121.285,23.556 R27.1@121.285,24.802
  Bottom Layer w0.324: J4.01@121.031,7.493 121.276,7.738 v1(121.276,23.546)
NetL_AUX_2: L_AUX.2 R64.1 | length 3.5
  Top Layer w0.254: L_AUX.2@17.018,44.248 17.037,44.267 R64.1@17.037,47.742
NetL_RXD_2: L_RXD.2 R63.1 | length 5
  Top Layer w0.254: L_RXD.2@12.234,44.248 12.807,44.821 13.706,44.821 14.56,45.675 R63.1@14.56,47.742
NetL_TXD_2: L_TXD.2 R62.1 | length 6.2
  Top Layer w0.254: L_TXD.2@7.45,44.061 8.44,44.061 11.761,47.382 11.761,47.507 11.959,47.705 R62.1@12.084,47.705
NetPWR_2: PWR.2 R5.1 | length 2.1
  Top Layer w0.324: PWR.2@94.361,5.358 96.027,5.358 96.268,5.117 R5.1@96.393,5.117
NetQ1_B: Q1.B R17.2 R20.2 | length 10.7
  Top Layer w0.324: R20.2@55.843,13.208 58.263,13.208 58.584,13.529 58.252,13.861 57.259,13.861 56.896,14.224 55.689,14.224 55.499,14.414 55.499,15.367 55.753,15.621 57.531,15.621 57.773,15.379 58.421,15.379 58.584,15.215 R17.2@58.584,15.113
NetQ2_B: Q2.B R36.2 | length 2.4
  Top Layer w0.324: R36.2@26.416,58.838 26.541,58.838 27.572,59.869 27.572,60.048 27.91,60.386 Q2.B@28.11,60.386
NetQ3_B: Q3.B R37.2 | length 2.9
  Top Layer w0.324: R37.2@78.359,58.838 78.484,58.838 79.896,60.25 79.896,60.302 80.234,60.64 Q3.B@80.434,60.64
NetQ4_B: Q4.B R38.2 R40.1 | length 3.5
  Top Layer w0.324: R38.2@16.002,60.288 R40.1@17.526,60.288 18.462,60.288 18.682,60.508 18.682,60.556 19.02,60.894 Q4.B@19.238,60.894
NetQ5_B: Q5.B R39.2 R41.1 | length 3.9
  Top Layer w0.324: R39.2@67.945,60.288 R41.1@69.469,60.288 70.738,60.288 71.344,60.894 Q5.B@71.544,60.894
NetQ6_B: Q6.B R46.2 | length 2.6
  Top Layer w0.324: R46.2@43.307,58.838 43.432,58.838 44.59,59.996 44.59,60.175 44.928,60.513 Q6.B@45.128,60.513
NetQ7_B: Q7.B R47.2 | length 2.8
  Top Layer w0.324: R47.2@95.377,58.838 95.502,58.838 96.712,60.048 97.241,60.048 Q7.B@97.579,60.386
NetQ8_B: Q8.B R48.2 R50.1 | length 3.7
  Top Layer w0.324: R48.2@32.893,59.907 R50.1@34.417,59.907 35.516,59.907 36.122,60.513 Q8.B@36.322,60.513
NetQ9_B: Q9.B R49.2 R51.1 | length 3.6
  Top Layer w0.324: R49.2@85.09,60.161 R51.1@86.614,60.161 88.01,60.161 88.362,60.513 Q9.B@88.562,60.513